# Altium PCB Charger-v1.1.PcbDoc (part 3 of 3)
Units mil, origin at the board's own origin, x right, y up, seen from the top; angles counter-clockwise.
Board outline 1633.11 x 2476.1 mil, 2 copper layers (Top Layer, Bottom Layer), stack 61.811 mil thick; 91 components, 62 nets, 311 pads, 190 vias.
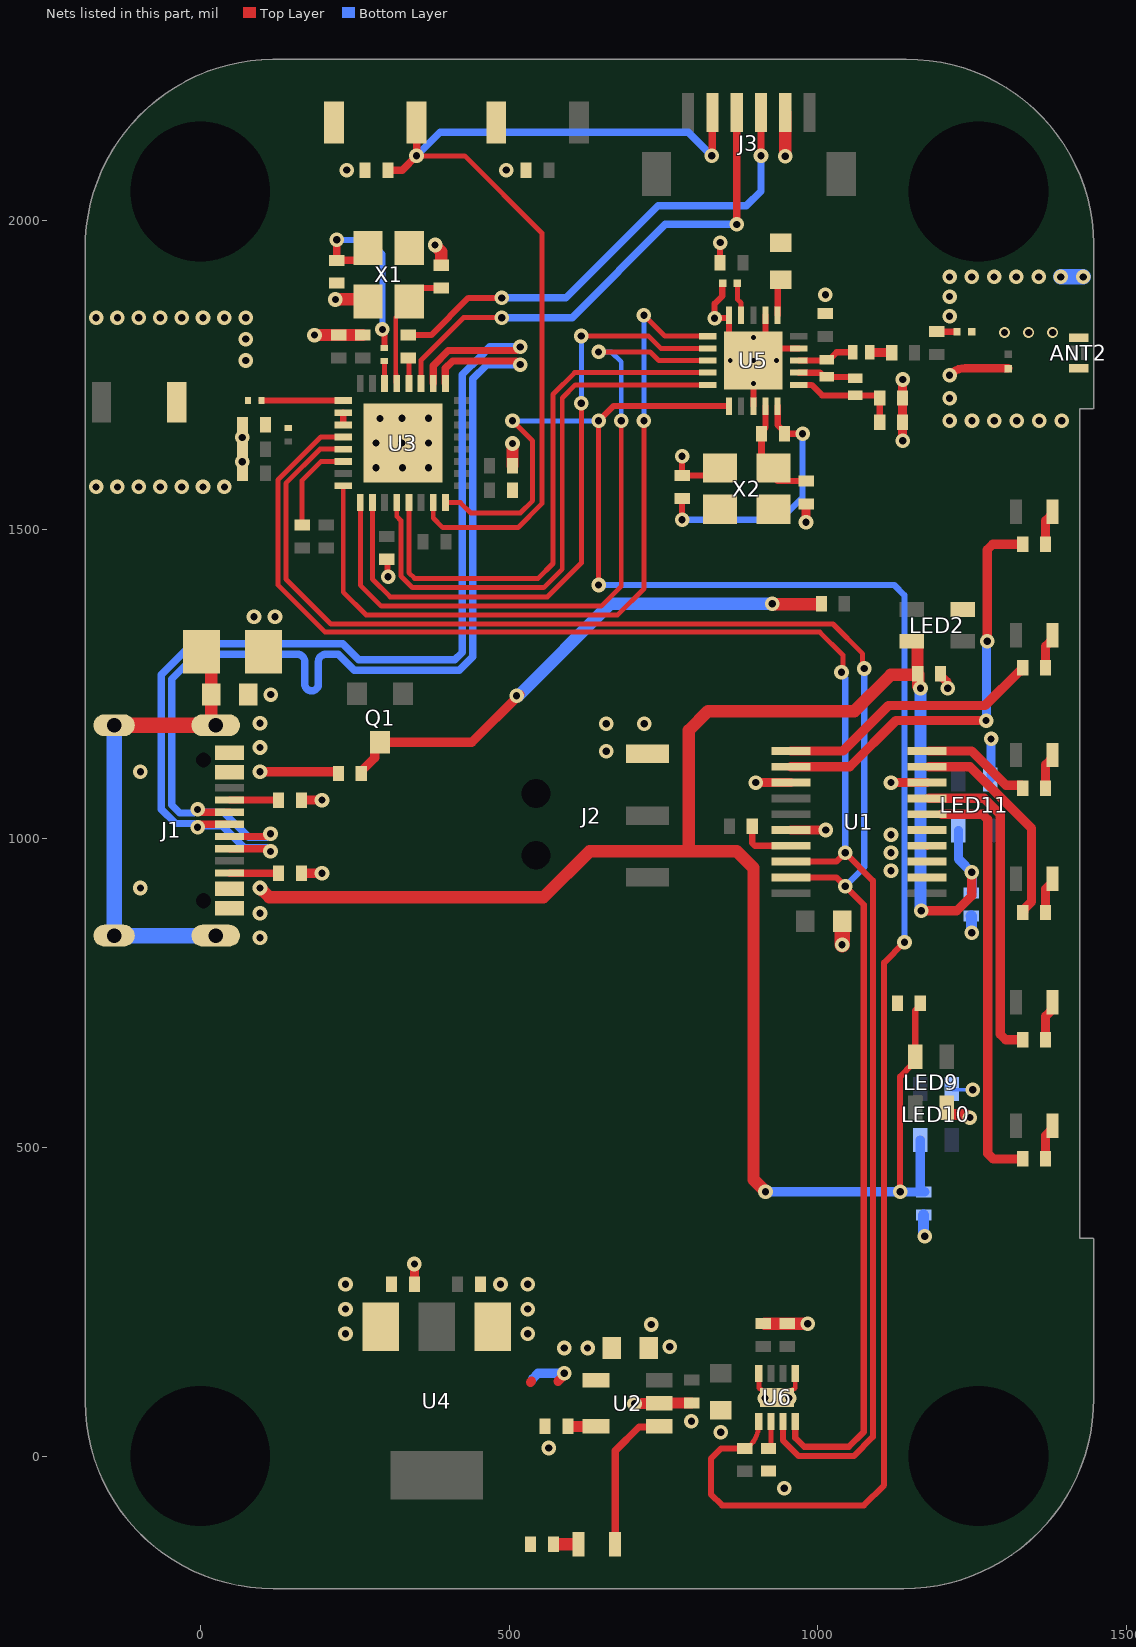
[diagram p2: the nets of this part, all layers, seen from the top]

## Via types
v1: diameter 23.62, hole 11.81, Top Layer to Bottom Layer, tented both sides, 157 vias
v2: diameter 23.62, hole 11.81, Top Layer to Bottom Layer, 30 vias
v3: diameter 17.72, hole 11.81, Top Layer to Bottom Layer, tented both sides, 3 vias

## Nets (pads, with @x,y where several pads share a name; then routed paths per layer and width w, separated by ;. In a path a pad name is that pad's centre, name@x,y a point inside that pad or via, vN(x,y) a via of type N, cw(c..) or ccw(c..) an arc to the next point about the centre after c; other vN are vias at no path point) (continued)
GND: ANT2.4 C1.1 C2.1 C3.1 C4.1 C5.1 C6.2 C7.2 C8.1 C9.1 C10.1 C11.2 C12.1 C13.1 C14.2 C15.1 C16.1 C17.1 C18.1 C19.1 C20.1 C22.2 C23.2 C24.1 C25.2 C26.1 C27.1 C28.1 C29.1 C30.1 C31.1 C32.2 C33.1 C34.1 C35.1 C36.1 J1.A1/B12 J1.B1/A12 J2.3 J3.2 LED2.4 LED9.4 LED10.4 LED11.4 R1.2 R2.2 R3.1 R9.1 R11.1 R19.1 SW1.1 SW2.1 U1.2 U1.3 U1.4 U1.5 U1.8 U1.13 U1.16 U2.2 U3.33 U4.1 U5.8 U5.14 U5.17 U5.20 U5.21 U6.1 U6.4 U6.9 X1.2 X1.4 X2.2 X2.4 | length 1950.7
  Top Layer w8: U6.4@904.15,133.81 904.15,109.86 918.55,102.66 933.78,95.04 934.15,94.86 948.74,102.39 963.2,109.86 U6.1@963.2,133.81
  Top Layer w10: C7.2@301.93,1451.9 302.94,1450.89 302.94,1424.71 v1(303.94,1423.71) ; v1(780,1618.5) C23.2@780,1587.5 812.13,1587.5 ccw(c812.13,1628.99) X2.4@841.47,1599.65 ; C17.1@838.04,1938.76 841.1,1938.76 841.57,1939.22 v1@841.57,1963.89 ; C24.1@845.83,1898.72 844.92,1897.82 844.92,1878.04 832.57,1865.69 v1(832.57,1842) 832.91,1842.34 855.93,1842.34 856.01,1842.42 U5.20@856.01,1847.25 856.01,1813 U5.21@895.38,1773.63 ; U5.8@895.38,1700.01 U5.21@895.38,1736.23 U5.21@895.38,1773.63 ; U5.17@915.06,1847.25 U5.21@915.06,1793.31 ; U5.14@969,1793.31 U5.21@915.06,1793.31 ; C22.2@1192,1820.5 1192.25,1820.25 1224.94,1820.25 C27.1@1225.19,1820 ; ANT2.4@1421.6,1761.79 ANT2.4@1422,1761.39 ; U5.21@895.38,1773.63 U5.21@915.06,1793.31
  Top Layer w12: v1(703,85) v1@703.27,85.27 ; U2.2@742.54,85.27 U2.2@742.81,85.54 U2.2@742.99,85.73 ; C30.1@795.08,85.73 C30.1@795.26,85.91 ; U1.4@1176.47,987.53 U1.4@1176.47,988
  Top Layer w13.5: v1@1213,1750.62 cw(c1238.51,1725.11) 1238.51,1761.19 C26.1@1308,1761.19
  Top Layer w15: R2.2@163.69,943.55 v1(197.06,943.55) ; R1.2@163.69,1062 v1(197.06,1062) ; C15.1@346.5,278 C15.1@347.68,279.18 ; C15.1@346.68,279.18 v1(346.68,311) ; v2(899.29,1090.36) U1.13@956,1090.36 ; X2.2@928.09,1532.72 X2.2@937.64,1542.28 ; U1.16@956,1013.59 v2(1012.71,1013.59) ; C25.2@980.25,1542.28 C25.2@980.63,1541.91 ; v1(980.63,1511.9) C25.2@980.63,1541.91 ; C25.2@981,1541.53 C25.2@980.63,1541.91 ; v2(1118.19,1090.36) U1.8@1176.47,1090.36 ; v1(1137,1643.99) C20.1@1137,1674 C19.1@1137,1713 v1(1137,1743) ; C33.1@1198.5,1266.75 1198.5,1263.25 1208.35,1253.4 1208.35,1244.65 v2(1210,1243)
  Top Layer w18: v1@703.27,85.27 U2.2@742.54,85.27 ; U2.2@742.99,85.73 C30.1@795.08,85.73 ; LED9.4@1208.59,563.66 1208.59,555.79 1211.4,552.97 1239.5,552.97 1244.48,548 v2(1246,548)
  Top Layer w20: v1(184.9,1814.9) C5.1@223.93,1814.9 C6.2@262.93,1814.9 ; v1(218.71,1872.49) 219.11,1872.09 224.43,1872.09 225.12,1872.78 X1.2@270.16,1872.78 ; v1(380.09,1960.7) 380.09,1959.72 389.93,1949.89 389.93,1936.9 ; C8.1@505.43,1603.4 v1(505.43,1639.27) ; C32.2@913.79,214 C31.1@950.3,214 ; v1(947.11,2104.48) J3.2@947.11,2175 ; C31.1@950.81,214 v1(983.26,214)
  Top Layer w25: v1(1039,828) C28.1@1039,863 ; C28.1@1039,866 C28.1@1041,864
  Bottom Layer w5: LED10.4@1216.59,594.34 1217.93,593 v2(1250.69,593) 1250.69,593.31 v2@1249,595 ; LED11.4@1278.59,1095.34 LED11.4@1280.19,1096.94
  Bottom Layer w15: LED11.4@1280.19,1096.94 v2(1280.19,1161)
  Bottom Layer w18: C35.1@1171,390.5 1171,359.52 1175,355.52 v2@1175,355 ; C36.1@1248,874.5 1248.5,874.5 1248.5,847.5 v2(1249,847)
  Bottom Layer w25: v1(1393.26,1909) v1(1429.31,1909)
  other v1: 945.36,-52 564,13 842.43,38.38 795.08,56.3 914.15,93.86 953.15,93.86 760,177 530,197.97 730,213 530,237.98 486,278 530,278 96.69,839.17 96.69,878.59 1118.19,947.52 1118.19,976.76 1118.19,1006 657.04,1140.86 96.69,1147.13 657.04,1185.44 718.69,1185.44 96.69,1186.55 114.19,1232.86 86.94,1358.68 120.89,1358.68 -168.81,1569 -134.17,1569 -99.52,1569 -64.88,1569 -30.23,1569 4.41,1569 39.05,1569 284.5,1600 327.25,1600 369.43,1600 67.93,1609.91 284.28,1640.27 326.68,1640.27 369.43,1640.27 67.93,1649.17 1213,1676 1249.3,1676 1285.6,1676 1321.9,1676 1358.2,1676 1394.5,1676 290.81,1679.95 326.68,1680 369.43,1680 1213,1712.81 1213,1749.62 73.7,1773.71 73.7,1808.36 -168.81,1843 -134.17,1843 -99.52,1843 -64.88,1843 -30.23,1843 4.41,1843 39.05,1843 73.7,1843 1213,1845.36 1213,1877.18 1012,1880.05 1213,1909 1249.05,1909 1285.1,1909 1321.16,1909 1357.21,1909 841.57,1964.63 236.93,2081.99 495.21,2081.99
  other v2: 1173,356
IO2: R17.2 U3.6 | length 151.6
  Top Layer w8: R17.2@164.9,1507.4 164.9,1579.72 195.08,1609.9 U3.6@230.9,1609.9
  Top Layer w10: U3.6@230.9,1609.9 U3.6@231.42,1610.41
IO9: C14.1 J3.5 SW2.2 U3.15 | length 1605.7
  Top Layer w8: v1(350,2105) 428,2105 553,1980 553,1541.74 514.33,1503.07 392.77,1503.07 377.09,1518.75 U3.15@377.09,1543.48
  Top Layer w12: C14.1@303.81,2082 327,2082 v1(350,2105) 350.24,2105.24 SW2.2@350.24,2159 ; v1@828.5,2105 828.5,2174.5 J3.5@829,2175
  Bottom Layer w12: v1(350,2105) 388,2143 790,2143 v1(828,2105)
NetANT1_1: ANT1.1 L1.1 | length 0.1
  Top Layer w12: ANT1.1@-37.97,1708.85 ANT1.1@-37.88,1708.94
NetANT2_1: ANT2.1 C27.2
  other v3: 1302,1819 1341,1819 1380,1819
NetC1_2: C1.2 J1.S1 J1.S2 J1.S3 J1.S4 R3.2 | length 802.8
  Top Layer w20: C1.2@1,1309 17.86,1292.14 R3.2@17.86,1232.86 17.86,1183.14 J1.S4@17.86,1182.94
  Top Layer w25: J1.S3@-139.62,1183.14 17.86,1183.14 24.86,1183.14 J1.S4@25,1183
  Bottom Layer w25: J1.S3@-139.62,1183.14 J1.S2@-139.62,842.59 J1.S1@24.95,842.59
NetC4_2: C4.2 L2.2 U3.2 U3.3 | length 28.6
  Top Layer w10: C4.2@105.43,1671.43 105.43,1668.17 C4.2@109.43,1664.17 ; U3.3@231.42,1669.47 U3.2@231.42,1689.15
NetC12_2: C12.2 L3.1 X1.1 | length 332.5
  Top Layer w10: v1@294,1824 cw(c284.51,1814.51) 297.93,1814.51 L3.1@297.93,1794.22
  Top Layer w12: C12.2@220.93,1935.9 250.6,1935.9 X1.1@271.47,1956.77 ; C12.2@221,1935.96 v1(221,1969)
  Top Layer w20: X1.1@271.47,1956.77 X1.1@271.47,1960.7
  Bottom Layer w10: v1(221,1969) 272,1969 294.83,1946.17 v1(294.83,1824)
NetC13_2: C13.2 U3.29 X1.3 | length 170.8
  Top Layer w8: U3.29@318.04,1736.4 316.52,1737.92 316.52,1750.78 316.43,1750.87 316.43,1843.19 324,1850.76 X1.3@324,1851 ; X1.3@327.43,1861.12 X1.3@338.4,1872.09 ; X1.3@338.4,1874.09 X1.3@338.4,1878.03
  Top Layer w10: X1.3@357.02,1890.9 C13.2@389.93,1890.9
NetC19_2: C19.2 C20.2 L4.2 U5.11 | length 179
  Top Layer w10: U5.11@969,1734.26 989.63,1734.26 1006.67,1717.22 L4.2@1060,1717.22 1095.28,1717.22 C19.2@1100,1712.5 ; C20.2@1100,1674 C19.2@1100,1713
NetC21_1: C21.1 L6.2 | length 36.1
  Top Layer w10: L6.2@1083.78,1787 L6.2@1084.28,1786.5 ; C21.1@1119,1786.5 C21.1@1119.5,1786
  Top Layer w15: L6.2@1084.28,1786.5 C21.1@1119,1786.5
NetC23_1: C23.1 R20.2 U5.10 X2.1 | length 418.2
  Top Layer w10: v1(780,1516) C23.1@780,1550.5 ; U5.10@934.75,1700.01 934.75,1669.25 941.5,1662.5 R20.2@942.5,1662.5 ; R20.2@945.5,1655 v1(975,1655)
  Bottom Layer w10: v1(780,1516) 938.92,1516 975,1552.08 v1(975,1655)
NetC24_2: C24.2 U5.19 | length 54
  Top Layer w8: C24.2@869.57,1898.72 869.57,1872.64 875.29,1866.92 875.29,1847.65 U5.19@875.69,1847.25
NetC25_1: C25.1 R20.1 U5.9 X2.3 | length 160.9
  Top Layer w10: R20.1@908.5,1655 908.5,1658.5 915.06,1665.06 U5.9@915.06,1700.01 ; X2.3@933,1580 934.47,1578.53 C25.1@981,1578.53
  Top Layer w12: R20.1@908.5,1655 908.5,1617.28 926.12,1599.65 X2.3@928.09,1599.65
NetJ1_A5: J1.A5 R1.1 | length 79.3
  Top Layer w12: J1.A5@47.39,1062.07 126.61,1062.07 R1.1@126.69,1062
NetJ1_B5: J1.B5 R2.1 | length 78.9
  Top Layer w12: J1.B5@47.81,943.55 R2.1@126.69,943.55
NetL1_2: L1.2 U3.1 | length 132.3
  Top Layer w10: L1.2@99.16,1708.92 99.24,1708.84 U3.1@231.42,1708.84
NetL3_2: L3.2 U3.30 | length 39
  Top Layer w8: U3.30@298.35,1732 U3.30@298.35,1736.4 L3.2@298.35,1771
NetL4_1: L4.1 L5.2 U5.12 | length 95.2
  Top Layer w10: U5.12@969,1753.94 1003.34,1753.94 1010.06,1747.22 1052.62,1747.22 1056.06,1743.78 L4.1@1060,1743.78
NetL5_1: L5.1 L6.1 U5.13 | length 92.8
  Top Layer w10: U5.13@969,1773.63 969.08,1773.71 1012.93,1773.71 1016.87,1777.65 1020.81,1777.65 1030.16,1787 L6.1@1056.22,1787
NetLED1_1: LED1.1 R7.1 | length 36.7
  Top Layer w15: LED1.1@607,-143 LED1.1@610,-146
  Top Layer w20: R7.1@574.5,-143 LED1.1@607,-143
NetLED1_2: LED1.2 U2.1 | length 244.3
  Top Layer w12: LED1.2@671.53,-143 671.53,8.36 710.18,47.01 747.01,47.01 U2.1@748,48
NetLED3_2: LED3.2 R4.2 | length 63.6
  Top Layer w15: R4.2@1368.5,481 1368.5,519.13 1379.53,530.16 LED3.2@1379.53,540
NetLED4_2: LED4.2 R5.2 | length 63.6
  Top Layer w15: R5.2@1368.5,674 1368.5,712.13 1379.53,723.16 LED4.2@1379.53,733
NetLED5_2: LED5.2 R8.2 | length 63.6
  Top Layer w15: R8.2@1368.5,880 1368.5,918.13 1379.53,929.16 LED5.2@1379.53,939
NetLED6_2: LED6.2 R12.2 | length 63.6
  Top Layer w15: R12.2@1368.5,1081 1368.5,1119.13 1379.53,1130.16 LED6.2@1379.53,1140
NetLED7_2: LED7.2 R18.2 | length 53.7
  Top Layer w15: R18.2@1368.5,1273 1368.5,1311.13 LED7.2@1379.53,1322.16
NetLED8_2: LED8.2 R13.2 | length 53.7
  Top Layer w15: R13.2@1368.5,1476 1368.5,1514.13 LED8.2@1379.53,1525.16
NetQ1_3: Q1.3 R22.1 R23.1 | length 879
  Top Layer w10: v2(926,1380) v2@927,1379 ; R23.1@1000.28,1379 R23.1@1001.28,1378
  Top Layer w15: R22.1@260.5,1105 260.5,1108.5 282.36,1130.36 282.36,1145.01 291.35,1154 Q1.3@298,1154 ; Q1.3@291,1155.62 439.62,1155.62 v2@517,1233
  Top Layer w20: v2@511.5,1230.5 v2(512,1231) ; v2@927,1379 R23.1@1000.28,1379
  Bottom Layer w20: v2(512,1231) 515,1231 664,1380 v2(926,1380)
NetR4_1: R4.1 U1.6 | length 678.9
  Top Layer w15: U1.6@1200.47,1039.18 1266.21,1039.18 1275,1030.39 1275,489.79 1283.79,481 R4.1@1331.5,481
NetR5_1: R5.1 U1.7 | length 522.4
  Top Layer w15: U1.7@1179.47,1064.77 1268.91,1064.77 1295,1038.68 1295,682.79 1303.79,674 R5.1@1331.5,674
NetR6_2: R6.2 U1.17 | length 81
  Top Layer w10: R6.2@892,1018.5 R6.2@893.5,1020 893.5,992.5 898,988 U1.17@943,988
NetR8_1: R8.1 U1.9 | length 349.6
  Top Layer w15: U1.9@1179.47,1115.95 1246.01,1115.95 1345.62,1016.34 1345.62,897.62 1333,885 1333,881.5 R8.1@1331.5,880
NetR9_2: R9.2 U2.5 | length 45.2
  Top Layer w18: R9.2@596.25,48.14 U2.5@641.44,48.14
NetR11_2: R11.2 U6.6 | length 43.4
  Top Layer w8: R11.2@923.83,12.49 U6.6@923.83,55.86
NetR12_1: R12.1 U1.10 | length 179.2
  Top Layer w15: U1.10@1179.47,1141.54 1248.7,1141.54 1304.25,1086 1330,1086 1331.5,1084.5 R12.1@1331.5,1081
NetR13_1: R13.1 U1.12 | length 685.7
  Top Layer w15: U1.12@956,1115.95 1051.4,1115.95 1126.44,1191 1271.87,1191 v1(1272.13,1190.74) ; v1(1274,1319) 1274,1467.21 1282.79,1476 R13.1@1331.5,1476
  Bottom Layer w15: v1(1272.13,1190.74) 1273,1191.61 1273,1318 v1(1274,1319)
NetR15_1: R15.1 U3.28 | length 41.7
  Top Layer w8: R15.1@336.93,1777.9 R15.1@337.72,1777.11 ; U3.28@337.72,1736.4 R15.1@337.72,1777
NetR18_1: R18.1 U1.11 | length 433.2
  Top Layer w15: U1.11@956,1141.54 1040.54,1141.54 1114,1215 1270.5,1215 1326.5,1271 1330,1271 1331.5,1272.5 R18.1@1331.5,1276
NetR19_2: R19.2 U5.16 | length 66.1
  Top Layer w10: U5.16@934.75,1847.25 R19.2@934.75,1899.4 ; R19.2@934.75,1906 R19.2@934.75,1899.4 ; R19.2@939.98,1904.63 R19.2@934.75,1899.4
RF_CE: U3.8 U5.1 | length 1252.5
  Top Layer w8: U3.8@231.42,1571.05 231.42,1398.58 268.19,1361.81 675.81,1361.81 718.2,1404.2 v1(718.2,1676) ; v1(718.2,1847) 752.2,1813 U5.1@821.76,1813
  Bottom Layer w8: v1(718.2,1676) v1(718.2,1847)
RF_IRQ: R10.2 U3.16 U5.6 U6.5 | length 3354.7
  Top Layer w8: U3.16@396.78,1543.48 421.11,1543.48 437.85,1526.74 518.05,1526.74 538,1546.69 538,1643.43 v1(505.43,1676) ; v1(644.77,1410.23) v1(644.77,1676) ; R10.2@881.15,12.36 887.84,15.4 889.16,16 890.18,17.02 890.27,17.11 ccw(c852.88,52.36) 903.88,46.08 U6.5@904.15,55.86
  Top Layer w10: v1(644.77,1676) 668.78,1700.01 824.89,1700.01 825,1700.12 844.73,1700.12 844.84,1700.01 U5.6@856.01,1700.01 ; R10.2@881.15,12.36 843.36,12.36 826.69,-4.31 826.69,-61.85 844.84,-80 1074,-80 1107,-47 1107,799 v2(1140,832)
  Bottom Layer w8: v1(505.43,1676) v1(644.77,1676)
  Bottom Layer w10: v1(644.77,1410.23) 1123.77,1410.23 1140,1394 v2@1140,832.67
RF_MISO: U3.12 U5.5 | length 924.5
  Top Layer w8: U3.12@318.04,1543.48 318.04,1521.43 324.72,1514.75 324.72,1424.9 343.62,1406 556,1406 586,1436 586,1713 607.26,1734.26 U5.5@821.76,1734.26
RF_MOSI: U3.13 U5.4 | length 899.5
  Top Layer w8: U3.13@337.72,1543.48 337.72,1430.28 347,1421 547,1421 571,1445 571,1719 605.94,1753.94 U5.4@821.76,1753.94
RF_SCK: U3.9 U5.3 | length 1172.7
  Top Layer w8: U3.9@258.98,1543.48 258.98,1410.02 293,1376 649,1376 681.49,1408.49 v1(681.49,1676) ; v1(644.77,1787.55) 728.45,1787.55 742.37,1773.63 U5.3@821.76,1773.63
  Bottom Layer w8: v1(644.77,1787.55) 665.45,1787.55 681.49,1771.51 v1(681.49,1676)
RF_SS: U3.10 U5.2 | length 1077.3
  Top Layer w8: U3.10@278.67,1543.48 278.67,1419.55 307.22,1391 562,1391 616.94,1445.94 v1(616.94,1704.33) ; v1(616.94,1813.31) 617.26,1813 725.95,1813 745.64,1793.31 U5.2@821.76,1793.31
  Bottom Layer w8: v1(616.94,1704.33) v1(616.94,1813.31)
RXD0: J3.4 U3.27 | length 819.3
  Top Layer w8: U3.27@357.43,1738 357.43,1774.43 426,1843 v1(488,1843)
  Top Layer w12: v1(868.37,1994) J3.4@868.37,2175
  Bottom Layer w12: v1(488,1843) 602,1843 753,1994 v1(868.37,1994)
SCL: U1.18 U3.4 U6.7 | length 2847.5
  Top Layer w8: U3.4@231.42,1649.78 195.02,1649.78 125.5,1580.26 125.5,1410.5 202,1334 1003,1334 1040.19,1296.81 1040.19,1271.19 v2(1038,1269)
  Top Layer w10: U6.7@943.52,55.86 943.52,25.1 968.62,0 1058,0 1089,31 1089,931.76 v2(1044,976.76) 1029.65,962.41 U1.18@956,962.41
  Bottom Layer w10: v2(1038,1269) 1038,1265.31 1044,1259.31 v2(1044,976.76)
SDA: U1.19 U3.5 U6.8 | length 2788.1
  Top Layer w8: U3.5@231.42,1630.11 193.73,1630.11 138.5,1574.88 138.5,1419.9 211.4,1347 1024.23,1347 1072.42,1298.81 1072.42,1277.58 v2(1075,1275)
  Top Layer w10: U1.19@956,936.82 1029.65,936.82 v2(1044,922.47) 1074,892.47 1074,38.93 1050.07,15 977.64,15 963.2,29.44 U6.8@963.2,55.86
  Bottom Layer w10: v2(1044,922.47) 1075,953.47 v2(1075,1275)
TXD0: J3.3 R15.2 | length 794.5
  Top Layer w10: R15.2@336.93,1814.9 373.9,1814.9 434,1875 v1(488,1875)
  Top Layer w12: v1(907.74,2105.37) J3.3@907.74,2175
  Bottom Layer w12: v1(488,1875) 592,1875 741,2024 884,2024 907.74,2047.74 v1(907.74,2105.37)
USB_D_N: J1.A7 J1.B7 U3.25 | length 1825.3
  Top Layer w12: v1(-4.48,1046.86) -0.01,1042.39 J1.B7@47.39,1042.39 ; J1.A7@47.39,1003.02 109.22,1003.02 v1(113.69,1007.49) ; U3.25@396.78,1736.4 396.78,1761.1 408.57,1772.9 511.92,1772.9 v1(517.73,1767.08)
  Bottom Layer w12: v1(113.69,1007.49) 107.88,1001.68 78.3,1001.68 37.59,1042.39 -0.01,1042.39 v1(-4.48,1046.86) -10.29,1041.05 -33,1041.05 -46,1054.05 -46,1258.05 -6.05,1298 129.21,1298 157.21,1298 cw(c157.21,1286) 169.21,1286 169.21,1249.99 ccw(c180.21,1249.99) 191.21,1249.99 191.21,1286 cw(c203.21,1286) 203.21,1298 223.55,1298 249.36,1272.19 419.22,1272.19 441.02,1293.99 441.02,1744 464.11,1767.08 v1(517.73,1767.08)
USB_D_P: J1.A6 J1.B6 U3.26 | length 1814.4
  Top Layer w12: v1(-4.48,1018.24) -0.01,1022.7 J1.A6@47.39,1022.7 ; J1.B6@47.39,983.33 109.22,983.33 v1(113.69,978.87) ; U3.26@377.09,1736.4 377.09,1765.45 401.53,1789.9 511.92,1789.9 v1(517.73,1795.71)
  Bottom Layer w12: v1(113.69,978.87) 107.88,984.68 71.26,984.68 35.53,1020.41 -2.31,1020.41 v1(-4.48,1018.24) -10.29,1024.05 -40.04,1024.05 -63,1047.01 -63,1265.09 -13.09,1315 230.59,1315 256.4,1289.19 412.18,1289.19 424.02,1301.03 424.02,1751.04 452.08,1779.11 468.69,1795.71 v1(517.73,1795.71)
VBUS: C2.2 C15.2 C33.2 C34.2 C35.2 C36.2 J1.A4/B9 J1.B4/A9 LED2.2 LED9.2 LED10.2 LED11.2 R7.2 R22.2 U2.4 U4.3 | length 3526.9
  Top Layer w10: v2(1133,428) 1133,614.06 1153,634.06 LED9.2@1153,644.4 ; LED9.2@1157.41,646.34 1157.41,721.41 1165,729 C34.2@1165,734
  Top Layer w15: v1(96.69,1107.71) 219.29,1107.71 R22.2@220,1107 ; 534.5,119.45 536,120.95 ; 579.08,120.95 589,130.87 v1(589,134) ; v2(1167,883) 1167.35,882.65 1224.65,882.65 1249,907 v2(1249,945)
  Top Layer w20: v1(96.69,919.74) 111.76,904.66 555.66,904.66 630,979 791,979 ; v2(915,428) 895.56,447.44 895.56,952.19 868.75,979 791,979 ; LED2.2@1151.66,1319.41 1159.19,1319.41 1161,1317.6 C33.2@1161,1272 ; C33.2@1159.5,1265 1118,1265 1059,1206 822,1206 791,1175 791,979 ; C33.2@1161.5,1266.75 1162.5,1265.75 1162.5,1246.5 v2(1166,1243)
  Bottom Layer w15: 538,125.21 546.79,134 v1(589,134) ; v2@917,427 918,428 v2(1133,428) ; v2@1129,427 1129.5,427.5 C35.2@1171,427.5 ; LED10.2@1165.41,511.66 1165.41,429.59 1167,428 C35.2@1173,428 ; LED11.2@1227.41,1012.66 1227.41,966.59 1250.22,943.78 1250.22,913 1248.72,911.5 C36.2@1248,911.5
  Bottom Layer w20: v2(1166,1243) 1166,889 1166.31,888.69 1166.31,883.69 v2(1167,883)
  other v1: 589,175 627,175 235,197.97 235,237.98 235,278 -97,919.74 -97,1107.71
pads on no net: ANT1.2 J1.A8 J1.B8 J1.MH J2. J2.2 J3.MP1 J3.MP2 LED11.3 U1.1 U1.14 U1.15 U3.19 U3.20 U3.21 U3.22 U3.23 U3.24

## Polygon pours and split planes (outlines as drawn)
GND on Top Layer "NONET_L-01_P-001" (solid, remove dead copper, pour order 7): 1441,94.77 1441,345 1415.98,345 1415.98,359.03 ccw(c1399.05,361.39) 1416.14,361.42 1416.14,1695.04 1415.98,1709 1435,1709 cw(c1435,1707.01) 1437,1707 1437,1722 cw(c1437.99,1722) 1438,1723 1438,1775 1437.05,1945.39 ccw(c1144.19,1961.36) 1119.6,2253.62 112.76,2253.62 ccw(c114.69,1962.17) -176.66,1954.25 -176.66,1905 -176.09,254 -176.6,103.04 -176.65,102.99 -176.66,100.32 ccw(c119.33,91.68) 105.87,-204.13 1127.37,-204.13 ccw(c1137.07,99.68)
VBUS on Top Layer "NONET_L-01_P-001" (solid, pour order 1): -19.56,949.56 -8.06,938.06 111,938.06 111,906.56 -19.44,906.56 -21,905 -21,870.15 -153.18,870.14 -153.18,1155.58 -21,1155.58 -21,1122 -19.56,1120.56 111,1120.56 111,1093 -8,1093 -19.56,1081.44
GND on Bottom Layer "NONET_L-01_P-001" (solid, remove dead copper, pour order 3): 1441,94.77 1441,345 1415.98,345 1415.98,359.03 ccw(c1399.05,361.39) 1416.14,361.42 1416.14,1695.04 1415.98,1709 1435,1709 cw(c1435,1707.01) 1437,1707 1437,1722 cw(c1437.99,1722) 1438,1723 1438,1775 1437.05,1945.39 ccw(c1144.19,1961.36) 1119.6,2253.62 112.76,2253.62 ccw(c114.69,1962.17) -176.66,1954.25 -176.66,1905 -176.09,254 -176.6,103.04 -176.65,102.99 -176.66,100.32 ccw(c119.33,91.68) 105.87,-204.13 1127.37,-204.13 ccw(c1137.07,99.68)
VBUS on Bottom Layer "VBUS_L02_P008" (solid, remove dead copper, pour order 8): 211,305 211,109 660,109 660,226.8 287.2,226.8 268,246 268,305
VBUS on Bottom Layer "NONET_L-01_P-001" (solid, pour order 5): 114,1154.66 -131.42,1154.66 -131.42,875 114,875

## Other copper
Top Layer:
  rectangle net GND: 1111,930 1209,1022
  rectangle net NetC13_2: 311.77,1839 365,1904
  region net BATTERY: 851,196.02 851,153 1001,153 1001,196.02
  region net GND: 759.04,1209.72 639.66,1209.72 639.66,1121.86 759.04,1121.86
  rectangle net 3V3: 151.5,1427.8 216.5,1479.4
  rectangle net VBUS: 516,111.13 589,144.54
  rectangle net VBUS: 516,-155.5 543.5,130.87
  rectangle net 3V3: 922,842 994,921
  region net BATTERY: 950.15,195 915.15,195 915.15,118.86 950.15,118.86
  region net GND: 971.15,113.86 897.15,113.86 897.15,75.86 971.15,75.86
  region net BATTERY: 779,953 779,111 862,111 862,953
  region net BATTERY: 860,148.48 720.69,148.48 720.69,120.48 860,120.48
  region net BATTERY: 860,139 720.69,139 720.69,111 860,111
  region net 3V3: 473.55,150.54 300,150.54 300,-108.11 473.55,-108.11
  region net VBUS: 681,192.5 571.58,192.5 571.58,111.13 681,111.13
  region net GND: 548,296.94 444.27,296.94 444.27,165 548,165
  region net BATTERY: 861,953 639.66,953 639.66,864 861,864
  region net NetC12_2: 295,1954 207,1954 207,1925 295,1925
  rectangle net NetC13_2: 311.77,1875 405,1904
  rectangle net 3V3: 954,1805 1025,1826
  rectangle net NetC25_1: 900.75,1568.25 994.75,1593.25
  rectangle net GND: 767,1576 869,1599.65
  rectangle net NetC23_1: 767,1532.72 869,1560
  rectangle net GND: 900,1532 994,1557
  rectangle net GND: 1299,1754.28 1437.75,1768.28
  rectangle net NetC1_2: -29,1179 42,1337
  region net 3V3: 427,294 366,294 366,234 427,234
  region net ANT: 1147.5,1798 1147.5,1774.38 1436.37,1774.38 1436.37,1798
  region net NetANT2_1: 1437.53,1806.22 1437.53,1833.78 1242.69,1833.78 1242.69,1806.22
  rectangle net NetANT1_1: -53.72,1691.67 82.35,1726.31
  rectangle net 3V3: 95.43,1622 154,1647.44
  rectangle net NetC4_2: 96.43,1656.93 148.49,1687.15
  rectangle net NetC4_2: 96.43,1663.96 245.18,1695.01
  region net GND: 517.73,1550.9 517.73,1620.39 492.43,1620.39 492.43,1550.9
  region net 3V3: 480.73,1550.9 480.73,1620.39 455.43,1620.39 455.43,1550.9
  rectangle net 3V3: 408.83,1562.04 469.83,1596.25
  region net 3V3: 284,1720.9 284,1787 249.98,1787 249.98,1720.9
  rectangle net 3V3: 209.93,1765.4 280.93,1786.9
  rectangle net VBUS: -101,167 327,299
  rectangle net 3V3: 340,-43 427,248.45
  rectangle net VBUS: -101,206 -21,930.29
  pour cut-out: 1231,1695 1231,1891.85 1446.42,1891.85 1446.42,1695
  pour cut-out: 50,1735 249.2,1735 249.2,1698 170,1698 86.93,1698 86.93,1688 50,1688
  pour cut-out: -186.61,1824 50,1824 50,1588 -186.58,1588
Bottom Layer:
  region net BATTERY: 1002.41,195.52 779.26,195.52 779.26,141.59 1002.41,141.59
  region net 3V3: 842.43,-108.96 1344.1,312 1312.47,349.69 810.8,-71.26
  region net 3V3: 1344.1,312 1344.1,1600.17 1297,1600.17 1297,312
  region net 3V3: 842.43,-65.69 315.98,-65.69 315.98,-108.96 842.43,-108.96
  region net BATTERY: 779.07,891 779.07,150.5 886,150.5 886,891
  region net BATTERY: 886,951.86 639.66,951.86 639.66,864 886,864
  region net NetANT2_1: 1396.07,1806.07 1396.07,1834.07 1243,1834.07 1243,1806.07
  pour cut-out: 50,1735 249,1735 249,1698 166,1698 85,1698 85,1688 50,1688
  pour cut-out: 1231,1695 1231,1891.85 1446.42,1891.85 1446.42,1695
  pour cut-out: -186.61,1824 50,1824 50,1588 -186.58,1588

## Silkscreen, mask and mechanical layers (free items; w line width, h text height)
Top Overlay:
  lines w5: 399.49,1777 765.38,1777 765.38,1853 399.49,1853 ; 399.49,1777.9 399.49,1851.9 ; -172.18,1385 -172.18,1548 -42,1548 -42,1385 -172.18,1385 ; 50,1565.53 124,1565.53 124,1694 50,1694 50,1565.53 ; 201,1758 201,1834 360,1834 360,1758 201,1758
  lines w7: 142.11,1754.9 142.12,1680.9 ; 796,142 796,159 ; 1012.93,1694.89 1012.93,1731.93 ; 1028,1862 1028,1868.37 1039.63,1880 ; 1075.91,1646.76 1075.91,1695.04 ; 1138,1939.63 1159.39,1918.24 1159.39,1894.87 1159.39,1809.55 ; 1146.65,1972.41 1191.75,1927.32 1191.75,1841 ; 1150.24,1646.76 1192.99,1604.01 ; 1152.25,1699.75 1194.99,1657.01
  text "BOOT" at 198.31,2210.73 h55
  text "RST" at 461,2210.73 h55
  text "PROGRAMMING" at 700.47,2210.73 h55
  text "@" at 770.38,1832.07 h30
  text "@" at 364.38,1812.07 h30
  text "~" at 100.01,1543.12 h45
  text "#" at 1278.23,1514.93 h45
  text "~" at -65.42,1359.86 h45
  text "#" at 1278.23,1314.93 h45
  text "#" at 1278.23,1120.85 h45
  text "#" at 1278.23,920.77 h45
  text "#" at 1278.23,720.69 h45
  text "#" at 1278.23,520.61 h45
  text "Note:" at 1371.12,96.83 h48 r90
  text "# >> LED3 - LED8" at 1414.34,96.31 h48 r90
  text "BATTERY CHARGER" at -118.01,61.45 h50 r90
  text "CHARGING" at 712,-168 h50
Bottom Overlay:
  drawing of 15 lines, arcs and shapes, not listed
  text "Rev-v1.1" at -160.49,344.55 h45 r270
Board Outline:
  circle w0.5: c0,2047.24 r113.19
  circle w0.5: c1259.84,2047.24 r113.19
  circle w0.5: c1259.84,0 r113.19
  circle w0.5: c0,0 r113.19
  lines w5: -186.61,1954.25 cw(c119.46,1955.27) 117.44,2261.34 1142.48,2261.3 cw(c1144.93,1959.73) 1446.5,1962.28 1446.42,1696.42 1445.39,1695.39 1423.5,1695.39 1423.5,352.28 1445.47,352.28 1446.5,351.26 1446.5,93.27 cw(c1138.48,93.25) 1138.5,-214.76 118.46,-214.76 cw(c117.52,89.29) -186.54,88.27 -186.54,1195.16 -186.61,1954.25
Fabrication:
  drawing of 191 lines, arcs and shapes, not listed
  text "Layer" at 1933.74,628 h60
  text "Name" at 2343.65,628 h60
  text "Material" at 3273.4,628 h60
  text "Thickness" at 4133.16,628 h60
  text "Constant" at 4783,628 h60
  text "Board Layer Stack" at 5352.86,628 h60
  text "Top Overlay" at 2343.65,508 h60
  text "Top Solder" at 2343.65,388 h60
  text "Solder Resist" at 3273.4,388 h60
  text "0.39mil" at 4133.16,388 h60
  text "3.5" at 4783,388 h60
  text "1" at 1933.74,268 h60
  text "Top Layer" at 2343.65,268 h60
  text "1.38mil" at 4133.16,268 h60
  text "Dielectric 1" at 2343.65,148 h60
  text "FR-4" at 3273.4,148 h60
  text "59.06mil" at 4133.16,148 h60
  text "4.8" at 4783,148 h60
  text "2" at 1933.74,28 h60
  text "Bottom Layer" at 2343.65,28 h60
  text "1.38mil" at 4133.16,28 h60
  text "Bottom Solder" at 2343.65,-92 h60
  text "Solder Resist" at 3273.4,-92 h60
  text "0.39mil" at 4133.16,-92 h60
  text "3.5" at 4783,-92 h60
  text "Bottom Overlay" at 2343.65,-212 h60
  text "Total board thickness:" at 1933.74,-332 h60
  text "62.60mil" at 4133.16,-332 h60
Drill Drawing:
  circle w10: c2067.11,1475.39 r33.33
  lines w10: 2033.78,1358.72 2100.45,1358.72 2067.11,1292.06 2033.78,1358.72 ; 2033.78,1608.72 2050.45,1608.72 2050.45,1592.06 2083.78,1592.06 2083.78,1608.72 2100.45,1608.72 2100.45,1642.06 2083.78,1642.06 2083.78,1658.72 2050.45,1658.72 2050.45,1642.06 2033.78,1642.06 2033.78,1608.72 ; 2033.78,1742.06 2033.78,1758.72 2050.45,1775.39 2033.78,1792.06 2033.78,1808.72 2050.45,1808.72 2067.11,1792.06 2083.78,1808.72 2100.45,1808.72 2100.45,1792.06 2083.78,1775.39 2100.45,1758.72 2100.45,1742.06 2083.78,1742.06 2067.11,1758.72 2050.45,1742.06 2033.78,1742.06 ; 2033.78,1925.39 2067.11,1892.06 2100.45,1925.39 2067.11,1958.72 2033.78,1925.39 ; 2033.78,2058.72 2050.45,2058.72 2067.11,2042.06 2083.78,2058.72 2100.45,2058.72 2083.78,2075.39 2100.45,2092.06 2083.78,2092.06 2067.11,2108.72 2050.45,2092.06 2033.78,2092.06 2050.45,2075.39 2033.78,2058.72 ; 2033.78,2192.06 2100.45,2192.06 2100.45,2258.72 2033.78,2258.72 2033.78,2192.06
  lines w15: 1973.99,1247.06 11991.19,1247.06 ; 1973.99,2297.06 11991.19,2297.06 ; 2524.86,1097.06 2524.86,2447.06 ; 3124.7,1097.06 3124.7,2447.06 ; 4284.36,1097.06 4284.36,2447.06 ; 4790.24,1097.06 4790.24,2447.06 ; 5524.04,1097.06 5524.04,2447.06 ; 7023.59,1097.06 7023.59,2447.06 ; 7613.44,1097.06 7613.44,2447.06 ; 8359.24,1097.06 8359.24,2447.06 ; 9498.91,1097.06 9498.91,2447.06 ; 10588.59,1097.06 10588.59,2447.06 ; 1973.99,1097.06 11991.19,1097.06 11991.19,2447.06 1973.99,2447.06 1973.99,1097.06
  text "Symbol" at 2063.99,2342.06 h72
  text "Count" at 2569.86,2342.06 h72
  text "Hole Size" at 3169.7,2342.06 h72
  text "Plated" at 4329.36,2342.06 h72
  text "Hole Type" at 4835.24,2342.06 h72
  text "Drill Layer Pair" at 5569.04,2342.06 h72
  text "Via/Pad" at 7068.59,2342.06 h72
  text "Pad Shape" at 7658.44,2342.06 h72
  text "Template" at 8404.24,2342.06 h72
  text "Hole Length" at 9543.91,2342.06 h72
  text "Routed Path Length" at 10633.59,2342.06 h72
  text "5" at 2569.86,2192.06 h60
  text "7.87mil (0.200mm)" at 3169.7,2192.06 h60
  text "PTH" at 4329.36,2192.06 h60
  text "Round" at 4835.24,2192.06 h60
  text "Top Layer - Bottom Layer" at 5569.04,2192.06 h60
  text "Pad" at 7068.59,2192.06 h60
  text "Rounded" at 7658.44,2192.06 h60
  text "c0h20z40x40" at 8404.24,2192.06 h60
  text "-" at 9543.91,2192.06 h60
  text "-" at 10633.59,2192.06 h60
  text "190" at 2569.86,2042.06 h60
  text "11.81mil (0.300mm)" at 3169.7,2042.06 h60
  text "PTH" at 4329.36,2042.06 h60
  text "Round" at 4835.24,2042.06 h60
  text "Top Layer - Bottom Layer" at 5569.04,2042.06 h60
  text "Via" at 7068.59,2042.06 h60
  text "Rounded" at 7658.44,2042.06 h60
  text "(Mixed)" at 8404.24,2042.06 h60
  text "-" at 9543.91,2042.06 h60
  text "-" at 10633.59,2042.06 h60
  text "2" at 2569.86,1892.06 h60
  text "23.62mil (0.600mm)" at 3169.7,1892.06 h60
  text "PTH" at 4329.36,1892.06 h60
  text "Slot" at 4835.24,1892.06 h60
  text "Top Layer - Bottom Layer" at 5569.04,1892.06 h60
  text "Pad" at 7068.59,1892.06 h60
  text "Rounded" at 7658.44,1892.06 h60
  text "r90_170h60_140r100" at 8404.24,1892.06 h60
  text "55.12mil (1.400mm)" at 9543.91,1892.06 h60
  text "31.50mil (0.800mm)" at 10633.59,1892.06 h60
  text "2" at 2569.86,1742.06 h60
  text "23.62mil (0.600mm)" at 3169.7,1742.06 h60
  text "PTH" at 4329.36,1742.06 h60
  text "Slot" at 4835.24,1742.06 h60
  text "Top Layer - Bottom Layer" at 5569.04,1742.06 h60
  text "Pad" at 7068.59,1742.06 h60
  text "Rounded" at 7658.44,1742.06 h60
  text "(Mixed)" at 8404.24,1742.06 h60
  text "66.93mil (1.700mm)" at 9543.91,1742.06 h60
  text "43.31mil (1.100mm)" at 10633.59,1742.06 h60
  text "2" at 2569.86,1592.06 h60
  text "24.41mil (0.620mm)" at 3169.7,1592.06 h60
  text "NPTH" at 4329.36,1592.06 h60
  text "Round" at 4835.24,1592.06 h60
  text "Top Layer - Bottom Layer" at 5569.04,1592.06 h60
  text "Pad" at 7068.59,1592.06 h60
  text "Rounded" at 7658.44,1592.06 h60
  text "c0hn62" at 8404.24,1592.06 h60
  text "-" at 9543.91,1592.06 h60
  text "-" at 10633.59,1592.06 h60
  text "2" at 2569.86,1442.06 h60
  text "46.85mil (1.190mm)" at 3169.7,1442.06 h60
  text "NPTH" at 4329.36,1442.06 h60
  text "Round" at 4835.24,1442.06 h60
  text "Top Layer - Bottom Layer" at 5569.04,1442.06 h60
  text "Pad" at 7068.59,1442.06 h60
  text "Rounded" at 7658.44,1442.06 h60
  text "c0hn119" at 8404.24,1442.06 h60
  text "-" at 9543.91,1442.06 h60
  text "-" at 10633.59,1442.06 h60
  text "4" at 2569.86,1292.06 h60
  text "226.38mil (5.750mm)" at 3169.7,1292.06 h60
  text "NPTH" at 4329.36,1292.06 h60
  text "Round" at 4835.24,1292.06 h60
  text "Top Layer - Bottom Layer" at 5569.04,1292.06 h60
  text "Pad" at 7068.59,1292.06 h60
  text "Rectangle" at 7658.44,1292.06 h60
  text "s0hn575" at 8404.24,1292.06 h60
  text "-" at 9543.91,1292.06 h60
  text "-" at 10633.59,1292.06 h60
  text "207 Total" at 2569.86,1142.06 h60
  text "Slot definitions :" at 2063.99,997.08 h60
  text "Routed Path Length" at 3096.68,997.08 h60
  text "= Calculated from tool start centre position to tool end centre position." at 4199.34,997.08 h60
  text "Hole Length" at 3096.68,897.11 h60
  text "= Routed Path Length + Tool Size = Slot length as defined in the PCB layout" at 3789.48,897.11 h60

## Dimensions
1142.48,2261.3 to 1138.5,-214.76 on Dimensions
1446.5,1962.28 to -186.61,1954.25 on Dimensions

## Text inside footprints (layer, text, board x,y; h text height)
J1: Mechanical 13 "PCB Edge" at -164.17,1065.55 h31.5 r270